# Altium PCB board2.PcbDoc
Units mm, origin at the board's own origin, x right, y up, seen from the top; angles counter-clockwise.
Board outline 12 x 10 mm, 2 copper layers (Top Layer, Bottom Layer), stack 0.97 mm thick; 2 components, 20 nets, 47 pads, 0 vias.
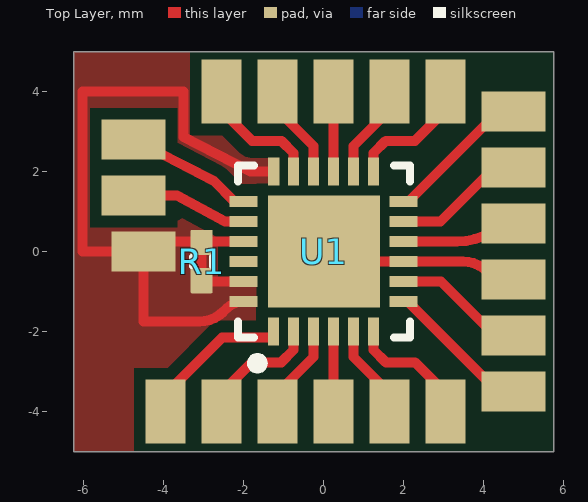
[diagram p0: Top Layer view]
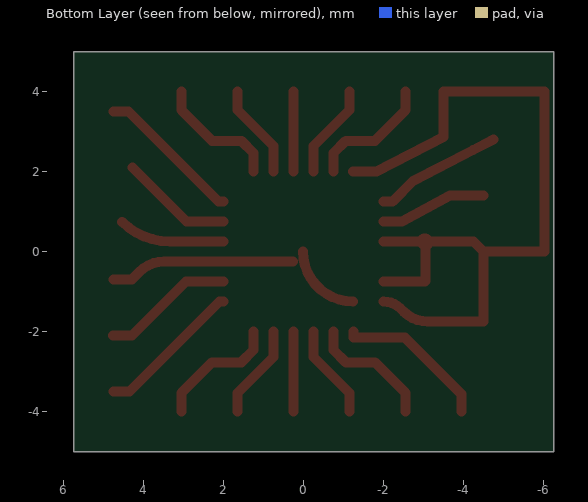
[diagram p1: Bottom Layer view, seen from below]

## Layer stack, top to bottom
Top Solder: solder mask 0.0127, Solder Resist, Dk 3.8
Top Layer: signal copper 0.035
Dielectric: core 0.9, FR-4, Dk 4.5
Bottom Layer: signal copper 0.035
Bottom Solder: solder mask 0.0127, Solder Resist, Dk 3.8

## Board outline
-6.25,-5 5.75,-5 5.75,5 -6.25,5

## Design rules (kind name [scope] priority, off if disabled: settings)
AcuteAngle [All] p1: minimum=6.00000000000000E+0001 checktracksonly=FALSE
Clearance Clearance_1 [All] p1: gap=0.2 ignorepadtopadclearanceinfootprint=FALSE except(0.3: Arc-Fill Arc-Poly Arc-Region Track-Fill Track-Poly Track-Region SMDPad-Fill SMDPad-Poly SMDPad-Region THPad-Fill THPad-Poly THPad-Region Via-Fill Via-Poly Via-Region Fill-Fill Fill-Poly Fill-Region Poly-Poly Poly-Region Region-Region)
ComponentClearance ComponentClearance_1 [OnLayer('Mechanical 15') vs HasFootprint('CONN_FPC_31P-P0.50_0.5K-AS-31PWB')] p1: gap=-1 collisioncheckmode=3 verticalgap=2540 showdistances=FALSE
ComponentClearance [All] p2: gap=0.3 collisioncheckmode=3 verticalgap=0.254 showdistances=FALSE
Height [InComponentClass('Bottom Side Components')] p1: minheight=0 maxheight=1 prefheight=0.5
HoleSize [All] p1: absolutevalues=TRUE maxlimit=6 minlimit=0.2 maxpercent=80.000 minpercent=20.000
HoleToHoleClearance HoleToHoleClearance_1 [IsVia vs IsThruPin] p1: gap=0.7 allowstackedmicrovias=TRUE
HoleToHoleClearance [All] p2: gap=0.5 allowstackedmicrovias=TRUE
MinimumSolderMaskSliver [All] p1 off: minsoldermaskwidth=0.254
PlaneClearance [All] p1: clearance=0.45
PlaneConnect [All] p1: planeconnectstyle=Direct reliefexpansion=0.3 reliefentries=4 reliefconductorwidth=0.381 reliefairgap=0.178
PolygonConnect [All] p1: connectstyle=Direct reliefconductorwidth=0.381 reliefentries=4 polygonreliefangle="90 Angle" airgapwidth=0.356
RoutingVias [All] p1: holewidth=0.3 width=0.6 viastyle="Through Hole" minholewidth=0.2 minwidth=0.45 maxholewidth=0.9 maxwidth=1.27
SilkToSilkClearance [All] p1 off: silktosilkclearance=0.254
SilkToSolderMaskClearance [IsPad] p1 off: minsilkscreentomaskgap=0.254 clearancetoexposedcopper=TRUE
SolderMaskExpansion [All] p1: expansion=0.102 istentingtop=FALSE
SupplyNets "Schematic Supply Nets_2" [InNet('GND')] p1: voltage=0.000
SupplyNets "Schematic Supply Nets_1" [InNet('3V3')] p2: voltage=0.000
UnRoutedNet [All] p1: checkbadconnections=TRUE
Width [All] p1: maxlimit=3.81 minlimit=0.14 preferedwidth=0.254
20 further rules are at their usual default settings.

## Components (designator, comment, footprint, x,y, rotation, side; value= is the part's Value field where it differs from the comment)
R1 "100k" R0402 -3.048,-0.25 r270 top
U1 "AW9523BTQR" VFQFPN-24_L4.0-W4.0-P0.50-BL-EP2.8 0,0 r0 top

## Footprints (in the part's own frame and the unit in brackets; to place one, negate y for a bottom-side part, rotate by r counter-clockwise, add the part's x,y. Pads: shape width x height; smd on the part's side, far side on the other; paste and mask are expansions set on the pad)
R0402 [mm]
  rrect10% 0.635x0.55 smd mask+0.05: 1(-0.476,0) 2(0.476,0)
  silkscreen extent -0.12,-0.25 0.13,0.25, body extent -0.52,-0.27 0.53,0.28, height 0.4
VFQFPN-24_L4.0-W4.0-P0.50-BL-EP2.8 [mm]
  rect 0.28x0.7 smd paste-100 mask+0.051: 1(-1.25,-2) 2(-0.75,-2) 3(-0.25,-2) 4(0.25,-2) 5(0.75,-2) 6(1.25,-2) 13(1.25,2) 14(0.75,2) 15(0.25,2) 16(-0.25,2) 17(-0.75,2) 18(-1.242,2)
  rect 0.7x0.28 smd paste-100 mask+0.051: 7(2,-1.25) 8(2,-0.75) 9(2,-0.25) 10(2,0.25) 11(2,0.75) 12(2,1.25) 19(-2,1.25) 20(-2,0.75) 21(-2,0.25) 22(-2,-0.25) 23(-2,-0.75) 24(-2,-1.25)
  rect 2.8x2.8 smd paste-100 mask+0.051: 25(0.013,0)
  silkscreen extent -2.14,-3.05 2.16,2.15

## Part data
R1: library part Resistor_100k_5%, "100k 0402", LCSC part number=C60491, P/N=RC0402FR-07100KL
U1: Clock Frequency=400kHz, Current - Output High(IOH)=-, Current - Output Low(IOL)=20mA, JLCPCB Part Class="Extended Part", LCSC Part Name=AW9523B产品手册, Manufacturer=AWINIC(艾为), Operating Temperature=-40℃~+85℃, Quiescent Supply Current=100nA, Voltage - Supply=2.4V~5.5V, Add into BOM=yes, Convert to PCB=yes, Datasheet=https://item.szlcsc.com/datasheet/AW9523BTQR/159410.html, Device=AW9523BTQR, Features="Built-in LED driver；Reset function；Cascade and address expansion；IO level configurable；Input anti-jitter", Interface=I2C, Interrupt Output="Interrupt Output", Manufacturer Part=AW9523BTQR, Number of I/O=16, Number of Supporting Devices=4, Output Logic Level - Low=60mV, Output Type=Push-Pull；Open-drain, Supplier=LCSC, Supplier Footprint=TQFN-24-EP(4x4), Supplier Part=C148077, Symbol=AW9523BTQR

## Free pads (board coordinates)
  rect 1.6x1 smd: ""(-4.75,1.4) ""(-4.75,2.8) ""(-4.5,0) ""(4.75,-3.5) ""(4.75,-2.1) ""(4.75,-0.7) ""(4.75,0.7) ""(4.75,2.1) ""(4.75,3.5)
  rect 1x1.6 smd: ""(-3.95,-4) ""(-2.55,-4) ""(-2.55,4) ""(-1.15,-4) ""(-1.15,4) ""(0.25,-4) ""(0.25,4) ""(1.65,-4) ""(1.65,4) ""(3.05,-4) ""(3.05,4)

## Nets (pads, with @x,y where several pads share a name; then routed paths per layer and width w, separated by ;. In a path a pad name is that pad's centre, name@x,y a point inside that pad or via, vN(x,y) a via of type N, cw(c..) or ccw(c..) an arc to the next point about the centre after c; other vN are vias at no path point)
3V3: pad.@-4.5,0 R1.1 R1.2 U1.18 U1.21 U1.23 U1.24 | length 20.7
  Top Layer w0.25: R1.1 R1.2 ccw(c-3.024,-0.726) -3.024,-0.75 U1.23 ; U1.24 ccw(c-2,-1.853) -2.427,-1.427 -2.5,-1.5 cw(c-3.104,-0.896) -3.104,-1.75 -4.5,-1.75 pad.@-4.5,0 ; U1.21 -3.024,0.25 -4.25,0.25 pad.@-4.5,0 ; U1.18 -1.825,2 -3.5,2.867 -3.5,4 -6.021,4 -6.021,0 pad.@-4.5,0
  Top Layer w0.4: R1.1 cw(c-3.024,0.226) R1.1@-3.024,0.25
GND: pad.@4.75,-0.7 U1.9 U1.25 | length 6.6
  Top Layer w0.25: U1.25@-1.237,-1.25 ccw(c-1.237,0) U1.25 ; U1.25@0.263,-0.25 U1.9 3.486,-0.25 cw(c3.486,-1.112) 4.096,-0.502 4.293,-0.7 pad.@4.75,-0.7
P0_0: pad.@1.65,-4 U1.5 | length 2.4
  Top Layer w0.25: U1.5 0.75,-2.64 1.65,-3.54 pad.@1.65,-4
P0_1: pad.@3.05,-4 U1.6 | length 3.2
  Top Layer w0.25: U1.6 1.25,-2.463 1.556,-2.769 2.285,-2.769 3.05,-3.533 pad.@3.05,-4
P0_2: pad.@4.75,-3.5 U1.7 | length 3.7
  Top Layer w0.25: U1.7 2.104,-1.25 4.353,-3.5 pad.@4.75,-3.5
P0_3: pad.@4.75,-2.1 U1.8 | length 3.3
  Top Layer w0.25: U1.8 2.936,-0.75 4.286,-2.1 4.75,-2.1 pad.@4.762,-2.1
P0_4: pad.@4.75,0.7 U1.10 | length 2.7
  Top Layer w0.25: U1.10 3.343,0.25 ccw(c3.343,1.934) pad.@4.533,0.743
P0_5: pad.@4.75,2.1 U1.11 | length 2.8
  Top Layer w0.25: U1.11 2.928,0.75 pad.@4.278,2.1
P0_6: pad.@4.75,3.5 U1.12 | length 3.7
  Top Layer w0.25: U1.12 2.124,1.25 4.375,3.5 pad.@4.75,3.5
P0_7: pad.@3.05,4 U1.13 | length 3.2
  Top Layer w0.25: U1.13 1.25,2.463 1.556,2.769 2.285,2.769 3.05,3.533 pad.@3.05,4
P1_0: pad.@-3.95,-4 U1.1 | length 3.9
  Top Layer w0.25: pad.@-3.95,-4 -3.95,-3.568 -2.532,-2.15 -1.25,-2.15 U1.1
P1_1: pad.@-2.55,-4 U1.2 | length 3.2
  Top Layer w0.25: pad.@-2.55,-4 -2.55,-3.533 -1.785,-2.769 -1.056,-2.769 -0.75,-2.463 U1.2
P1_2: pad.@-1.15,-4 U1.3 | length 2.4
  Top Layer w0.25: pad.@-1.15,-4 -1.15,-3.538 -0.25,-2.638 U1.3
P1_3: pad.@0.25,-4 U1.4 | length 2
  Top Layer w0.25: pad.@0.25,-4 U1.4
P1_4: pad.@1.65,4 U1.14 | length 2.4
  Top Layer w0.25: U1.14 0.75,2.64 1.65,3.54 pad.@1.65,4
P1_5: pad.@0.25,4 U1.15 | length 2
  Top Layer w0.25: U1.15 pad.@0.25,4
P1_6: pad.@-1.15,4 U1.16 | length 2.4
  Top Layer w0.25: pad.@-1.15,4 -1.15,3.538 -0.25,2.638 U1.16
P1_7: pad.@-2.55,4 U1.17 | length 3.2
  Top Layer w0.25: pad.@-2.55,4 -2.55,3.533 -1.785,2.769 -1.056,2.769 -0.75,2.463 U1.17
SCL: pad.@-4.75,2.8 U1.19 | length 3.2
  Top Layer w0.25: pad.@-4.75,2.8 -4.232,2.532 -2.74,1.76 -2.23,1.25 U1.19
SDA: pad.@-4.75,1.4 U1.20 | length 2.7
  Top Layer w0.25: pad.@-4.5,1.4 -3.658,1.4 -2.461,0.75 U1.20
pads on no net: U1.22

## Polygon pours and split planes (outlines as drawn)
3V3 on Top Layer "3V3_L01_P000" (solid, pour order 0): -6.25,5 5.75,5 5.75,-5 -6.25,-5